# Altium PCB Eth_PoE.PcbDoc (part 3 of 3)
Units mm, origin at the board's own origin, x right, y up, seen from the top; angles counter-clockwise.
Board outline 33 x 53 mm, 2 copper layers (Top Layer, Bottom Layer), stack 0.97 mm thick; 81 components, 62 nets, 294 pads, 109 vias.
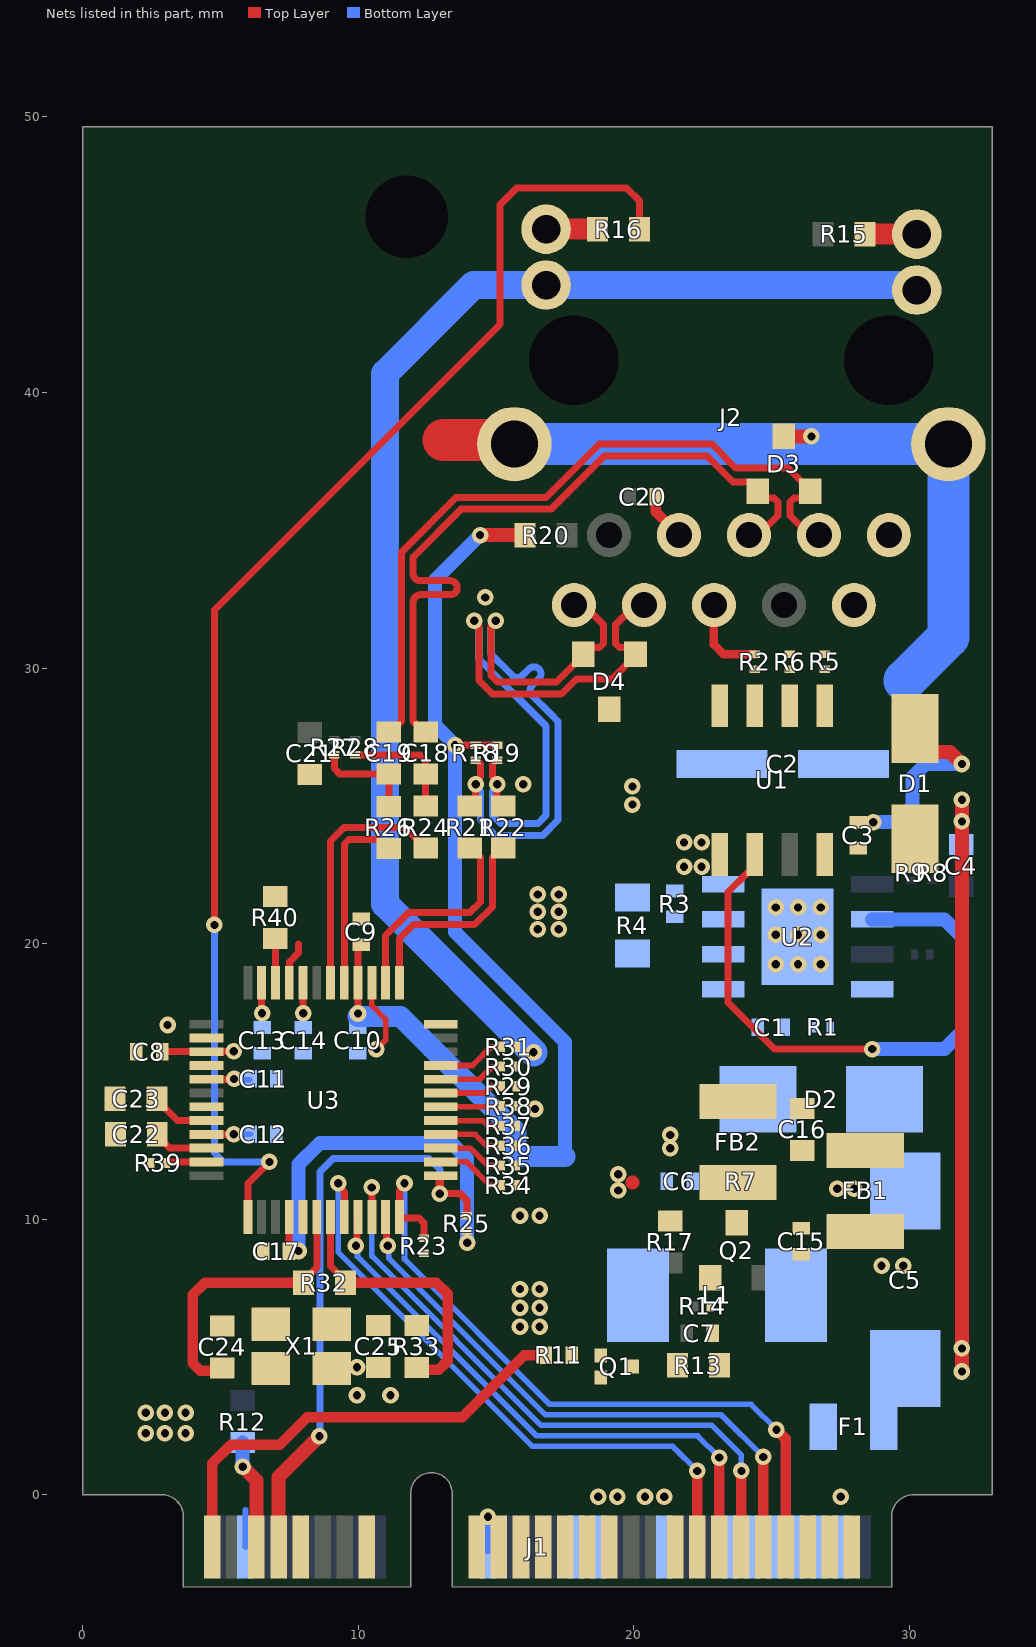
[diagram p2: the nets of this part, all layers, seen from the top]

## Via types
v1: diameter 0.6, hole 0.3, Top Layer to Bottom Layer, 109 vias

## Nets (pads, with @x,y where several pads share a name; then routed paths per layer and width w, separated by ;. In a path a pad name is that pad's centre, name@x,y a point inside that pad or via, vN(x,y) a via of type N, cw(c..) or ccw(c..) an arc to the next point about the centre after c; other vN are vias at no path point) (continued)
GND: C2.2 C5.2 C6.1 C8.1 C9.1 C10.1 C11.1 C12.1 C13.1 C14.1 C15.1 C16.1 C17.1 C20.1 C21.1 C22.1 C23.1 C24.1 C25.1 D2.1 D3.3 D4.3 J1.4 J1.9 J1.15 J1.17 J1.18 J1.19 J1.21 J1.23 J1.25 J1.26 J1.27 J1.28 J1.29 J1.34 J1.35 J1.40 J1.42 J1.44 J1.47 J1.49 J1.50 J1.51 J2.2 J2.7 J2.SH1 J2.SH2 Q1.2 R3.1 R9.1 R34.2 R35.2 R36.2 R37.2 R38.2 R39.2 R40.1 U1.5 U2.4 U3.3 U3.9 U3.14 U3.16 U3.19 U3.29 U3.48 X1.2 X1.4 | length 37
  Top Layer w0.203: U3.3@10.488,18.576 10.488,17.749 10.988,17.249 10.988,16.491 10.792,16.295 10.792,16.268 v1@10.816,16.244 ; D3.3@25.441,38.414 D3.3@25.45,38.405
  Top Layer w0.254: U3.9@7.488,18.576 U3.9@7.521,18.609 ; U3.9@7.495,18.609 7.495,19.336 7.828,19.668 7.828,19.99
  Top Layer w0.381: C20.1@20.79,36.22 20.79,35.667 J2.7@21.631,34.826
  Top Layer w0.508: D3.3@25.45,38.405 v1(26.441,38.405)
  Top Layer w1.524: 13.086,38.284 15.503,38.284 J2.SH1@15.661,38.126
  Bottom Layer w0.203: J1.4@5.9,-1.9 5.9,-0.541
  Bottom Layer w0.508: J1.18@14.7,-1.9 v1(14.7,-0.804)
  Bottom Layer w1.524: J2.SH1@15.661,38.126 J2.SH2@31.411,38.126 31.411,31.135 29.817,29.54
  other v1: 18.7,-0.076 19.4,-0.076 20.4,-0.076 21.1,-0.076 27.5,-0.076 2.286,2.233 2.977,2.233 3.726,2.233 2.286,2.972 2.977,2.972 3.726,2.972 9.948,3.611 11.163,3.611 9.948,4.623 15.863,6.096 16.573,6.096 15.863,6.785 16.573,6.785 15.863,7.463 16.573,7.463 28.987,8.306 29.769,8.306 15.863,10.126 16.573,10.126 27.381,11.1 27.991,11.1 21.321,12.573 21.321,13.056 16.408,13.997 10.654,16.173 3.073,17.046 16.51,20.523 17.272,20.523 16.51,21.158 17.272,21.158 16.51,21.784 17.272,21.784 21.819,22.784 22.454,22.784 21.819,23.673 22.454,23.673 15.977,25.781 14.605,32.563
LAN_ACT: J2.12 R15.1 | length 1.9
  Top Layer w0.762: R15.1@28.388,45.746 J2.12@30.261,45.746
LAN_LINK: J2.14 R16.1 | length 1.9
  Top Layer w0.762: J2.14@16.811,45.926 R16.1@18.684,45.926
LINKLED: R16.2 U3.25 | length 49.7
  Top Layer w0.254: v1(4.775,20.676) 4.775,32.106 15.138,42.469 15.138,46.815 15.745,47.422 19.736,47.422 20.208,46.95 R16.2@20.208,45.926 ; U3.25@5.988,10.076 5.988,11.294 v1(6.769,12.076)
  Bottom Layer w0.254: v1(4.775,20.676) 4.775,12.399 5.098,12.076 v1(6.769,12.076)
NetC1_1: C1.1 D2.2 L1.1 R7.2 U2.1
NetC1_2: C1.2 R1.1
NetC4_2: C4.2 C5.1 F1.1 L1.2 R8.2 | length 20.7
  Top Layer w0.508: v1(31.902,4.47) v1(31.902,5.309) v1(31.902,24.435) v1(31.902,25.216)
NetC6_2: C6.2 R7.1
NetC7_1: C7.1 Q2.1 R13.1 R14.2
NetC15_2: C15.2 FB1.1 Q2.3 R17.1
NetC18_2: C18.2 R24.1 R28.2 | length 4.3
  Top Layer w0.254: R28.2@9.888,26.848 12.237,26.848 12.436,26.649 C18.2@12.436,26.162 R24.1@12.436,24.986
NetC19_2: C19.2 R26.1 R27.2 | length 3.7
  Top Layer w0.254: R27.2@9.126,26.848 9.126,26.347 9.311,26.162 C19.2@11.108,26.162 R26.1@11.108,24.976
NetC22_2: C22.2 U3.22 | length 2
  Top Layer w0.254: C22.2@2.699,13.081 2.699,13.018 3.141,12.576 U3.22@4.488,12.576
NetC23_2: C23.2 U3.20 | length 2.2
  Top Layer w0.254: C23.2@2.692,14.377 2.692,14.313 3.43,13.576 U3.20@4.488,13.576
NetC24_2: C24.2 R32.1 U3.30 X1.1 | length 10.5
  Top Layer w0.254: R32.1@8.001,7.76 8.488,8.246 U3.30@8.488,10.076
  Top Layer w0.381: C24.2@5.055,4.598 4.958,4.501 4.262,4.501 3.988,4.775 3.988,7.252 4.432,7.696 R32.1@8.001,7.696 R32.1@8.001,7.76
NetC25_2: C25.2 R33.1 X1.3
NetQ1_1: Q1.1 R11.2
NetQ1_3: Q1.3 R13.2
NetR1_2: R1.2 U2.8
NetR2_1: R2.1 U1.3
NetR4_1: R4.1 U2.2 U2.9
  other v1: 25.146,19.253 25.954,19.253 26.776,19.253 25.146,20.32 25.954,20.32 26.776,20.32 25.146,21.311 25.954,21.311 26.776,21.311
NetR5_2: R5.2 U1.1
NetR6_2: R6.2 U1.2
NetR21_2: R21.2 U3.2 | length 7.8
  Top Layer w0.254: U3.2@10.988,18.576 10.988,20.295 11.812,21.12 14.036,21.12 14.43,21.514 14.43,23.132 14.099,23.462 R21.2@14.036,23.462
NetR22_2: R22.2 U3.1 | length 7.8
  Top Layer w0.254: U3.1@11.488,18.576 11.488,20.185 11.991,20.688 14.215,20.688 14.861,21.335 14.861,23.132 15.192,23.462 R22.2@15.255,23.462
NetR24_2: R24.2 U3.6 | length 9.1
  Top Layer w0.254: U3.6@8.988,18.576 8.988,23.722 9.479,24.214 11.685,24.214 12.118,23.78 12.118,23.716 12.372,23.462 R24.2@12.436,23.462
NetR26_2: R26.2 U3.5 | length 6.9
  Top Layer w0.254: U3.5@9.488,18.576 9.488,23.612 9.656,23.78 10.716,23.78 11.044,23.452 R26.2@11.108,23.452
NetR29_2: R29.2 U3.43 | length 2.3
  Top Layer w0.203: U3.43@12.988,14.576 14.575,14.576 14.818,14.819 R29.2@15.178,14.819
NetR30_2: R30.2 U3.44 | length 2.4
  Top Layer w0.203: U3.44@12.988,15.076 14.402,15.076 14.857,15.531 15.172,15.531 R30.2@15.178,15.538
NetR31_2: R31.2 U3.45 | length 2.5
  Top Layer w0.203: U3.45@12.988,15.576 14.138,15.576 14.818,16.256 R31.2@15.178,16.256
NetR32_2: R32.2 R33.2 U3.31 | length 10.2
  Top Layer w0.254: U3.31@8.988,10.076 8.988,8.297 R32.2@9.525,7.76
  Top Layer w0.381: R32.2@9.525,7.76 R32.2@9.525,7.696 12.827,7.696 13.233,7.29 13.233,4.851 12.909,4.527 12.212,4.527 R33.2@12.116,4.623
NetR34_1: R34.1 U3.38 | length 2.5
  Top Layer w0.203: U3.38@12.988,12.076 13.931,12.076 14.78,11.227 R34.1@15.178,11.227
NetR35_1: R35.1 U3.39 | length 2.5
  Top Layer w0.203: U3.39@12.988,12.576 14.062,12.576 14.693,11.945 R35.1@15.178,11.945
NetR36_1: R36.1 U3.40 | length 2.4
  Top Layer w0.203: U3.40@12.988,13.076 14.235,13.076 14.647,12.664 R36.1@15.178,12.664
NetR37_1: R37.1 U3.41 | length 2.3
  Top Layer w0.203: U3.41@12.988,13.576 14.518,13.576 14.712,13.382 R37.1@15.178,13.382
NetR38_1: R38.1 U3.42 | length 2.2
  Top Layer w0.203: U3.42@12.988,14.076 15.145,14.076 15.178,14.109 R38.1@15.178,14.152
NetR39_1: R39.1 U3.23 | length 1.5
  Top Layer w0.254: R39.1@3.018,12.04 3.018,12.042 3.052,12.076 U3.23@4.488,12.076
NetR40_2: R40.2 U3.10 | length 1.6
  Top Layer w0.254: R40.2@6.985,20.193 6.988,20.191 U3.10@6.988,18.576
NetU1_6: U1.6 U2.6 | length 22.2
  Top Layer w0.254: U1.6@24.384,23.233 24.384,22.758 24.211,22.585 24.13,22.585 23.414,21.869 23.414,17.861 25.103,16.172 v1(28.643,16.172)
  Bottom Layer w0.508: v1(28.643,16.172) 31.267,16.172 31.902,16.807 31.902,20.244 31.267,20.879 U2.6@28.643,20.879
POE_5V: F1.2 J1.46 J1.48
POE_PWR_N: C3.1 D1.2 J2.1 R5.1 R6.1 U1.4 | length 7.3
  Top Layer w0.508: D1.2@30.201,27.806 30.201,27.406 D1.2@30.645,26.962 ; D1.2@30.584,26.962 D1.2@30.645,26.962 ; v1(31.902,26.518) 31.458,26.962 D1.2@30.645,26.962
  Bottom Layer w0.508: v1(28.686,24.407) 29.55,24.407 30.11,24.967 30.11,26.05 30.578,26.518 v1(31.902,26.518)
POE_PWR_P: C2.1 C3.2 D1.1 J2.6 R2.2 R3.2 R4.2 U1.8 U2.3 | length 3.1
  Top Layer w0.305: J2.6@22.901,32.286 22.901,30.849 23.249,30.501 R2.2@24.384,30.501
  other v1: 19.946,25.044 19.946,25.705
RD_N: C19.1 D3.2 J2.3 | length 26.7
  Top Layer w0.254: C19.1@11.108,27.686 11.171,27.686 11.556,28.071 11.556,34.204 13.547,36.195 16.812,36.195 18.743,38.126 22.826,38.126 23.689,37.262 25.593,37.262 26.391,36.464 D3.2@26.391,36.414 26.15,36.173 25.806,36.173 25.657,36.024 25.657,35.534 26.365,34.826 J2.3@26.711,34.826
RD_P: C18.1 D3.1 J2.5 | length 26.6
  Top Layer w0.254: C18.1@12.436,27.686 12.372,27.686 11.988,28.071 11.988,31.771 11.988,32.406 cw(c12.242,32.406) 12.242,32.66 13.332,32.66 ccw(c13.332,32.914) 13.332,33.168 12.242,33.168 cw(c12.242,33.422) 11.988,33.422 11.988,34.025 12.036,34.073 13.726,35.763 16.991,35.763 18.922,37.694 22.647,37.694 23.593,36.748 24.059,36.748 24.208,36.747 24.491,36.464 D3.1@24.491,36.414 24.732,36.173 25.076,36.173 25.225,36.024 25.225,35.54 24.511,34.826 J2.5@24.171,34.826
TD_N: D4.1 J2.8 R19.1 R22.1 | length 24.8
  Top Layer w0.254: v1(14.207,31.72) 14.38,31.547 14.38,29.545 14.867,29.058 17.374,29.058 17.92,29.604 19.21,29.604 20.057,30.451 D4.1@20.057,30.501 19.816,30.742 19.472,30.742 19.323,30.891 19.323,31.572 20.037,32.286 J2.8@20.361,32.286 ; 14.861,26.048 14.861,26.526 14.984,26.649 R19.1@15.034,26.649 ; v1(15.034,25.781) 15.034,25.207 R22.1@15.255,24.986
  Bottom Layer w0.254: v1(14.207,31.72) 14.207,31.627 14.38,31.454 14.38,30.322 16.815,27.886 16.815,24.663 16.51,24.358 15.16,24.358 14.861,24.657 14.861,25.514 15.034,25.687 v1(15.034,25.781)
TD_P: D4.2 J2.10 R18.1 R21.1 | length 24.7
  Top Layer w0.254: R21.1@14.036,24.986 14.257,25.207 v1(14.257,25.781) ; R18.1@14.257,26.649 14.307,26.649 14.43,26.526 14.43,26.048 ; v1(14.984,31.72) 14.811,31.547 14.811,29.724 15.046,29.489 17.195,29.489 18.157,30.451 D4.2@18.157,30.501 18.398,30.742 18.742,30.742 18.891,30.891 18.891,31.572 18.176,32.286 J2.10@17.821,32.286
  Bottom Layer w0.254: v1(14.257,25.781) 14.257,25.687 14.43,25.514 14.43,24.478 14.981,23.926 16.689,23.926 17.247,24.484 17.247,28.065 16.963,28.349 16.305,29.007 cw(c16.484,29.186) 16.305,29.366 16.55,29.612 ccw(c16.371,29.791) 16.55,29.971 ccw(c16.371,29.791) 16.191,29.971 15.946,29.725 cw(c15.766,29.905) 15.586,29.725 15.497,29.815 14.811,30.5 14.811,31.454 14.984,31.627 v1(14.984,31.72)
TYPE1: J1.5 R12.1 | length 4
  Top Layer w0.508: v1(5.8,1.016) 6.3,0.516 J1.5@6.3,-1.9
  Bottom Layer w0.508: v1(5.8,1.016) R12.1@5.8,1.893
VDD: C16.2 C17.2 FB1.2 FB2.1 J2.11 J2.13 R23.1 R25.1 R29.1 R30.1 R31.1 U3.28 | length 62
  Top Layer w0.203: C17.2@7.48,8.839 7.484,8.843 v1(7.828,8.843) ; U3.28@7.484,10.072 U3.28@7.488,10.076
  Top Layer w0.254: C17.2@7.484,8.843 U3.28@7.484,10.072
  Bottom Layer w0.508: v1(7.828,8.843) 7.828,11.992 8.6,12.764 13.373,12.764 13.945,12.192 v1(13.945,9.144)
  Bottom Layer w1.016: v1(16.358,16.053) 10.973,21.438 10.973,40.691 14.178,43.896 J2.13@16.811,43.896 29.869,43.896 30.049,43.716 J2.11@30.261,43.716
VDDA: C8.2 C9.2 C10.2 C11.2 C12.2 C13.2 C14.2 FB2.2 R18.2 R19.2 R20.2 U3.4 U3.8 U3.11 U3.15 U3.17 U3.21 | length 48.6
  Top Layer w0.203: U3.21@4.488,13.076 U3.21@4.49,13.078 ; U3.17@4.488,15.076 U3.17@4.494,15.069 ; v1@5.477,13.078 v1(5.48,13.081) ; v1@5.48,15.069 v1@5.486,15.062
  Top Layer w0.254: C8.2@2.883,16.078 2.886,16.076 U3.15@4.488,16.076 v1@5.48,16.076 ; U3.21@4.49,13.078 v1@5.477,13.078 ; U3.17@4.494,15.069 v1@5.48,15.069 ; v1@6.488,17.6 U3.11@6.488,18.576 ; U3.8@7.988,18.576 7.991,18.572 v1@7.991,17.627 ; v1@9.988,17.463 U3.4@9.988,18.576 C9.2@9.988,19.921 ; v1(13.508,27.199) R18.2@14.257,27.199 R19.2@15.034,27.199
  Top Layer w0.381: v1@5.486,15.062 v1(5.486,15.088)
  Top Layer w0.508: v1(14.413,34.826) R20.2@16.053,34.826 ; 19.939,11.328 19.94,11.329 ; FB2.2@24.764,11.329 FB2.2@24.765,11.331
  Bottom Layer w0.203: v1(5.48,13.081) C12.2@6.083,13.081 ; v1@5.486,15.062 C11.2@6.058,15.062
  Bottom Layer w0.508: v1(14.413,34.826) 12.776,33.189 12.776,27.931 v1(13.508,27.199) 13.508,20.426 17.501,16.434 17.501,12.268
  Bottom Layer w0.762: v1@9.984,17.361 11.535,17.361 15.723,13.173 15.723,12.383 15.838,12.268 17.501,12.268
  other v1: 19.432,11.042 19.431,11.633 5.48,16.095 9.984,17.463 6.502,17.473 7.994,17.473
W5500_CS: J1.37 U3.32 | length 22.9
  Top Layer w0.254: v1(9.271,11.303) 9.271,11.214 9.5,10.986 U3.32@9.5,10.088
  Top Layer w0.381: J1.37@22.3,-1.9 v1(22.3,0.86)
  Bottom Layer w0.203: v1(9.271,11.303) 9.271,8.794 16.312,1.753 21.407,1.753 v1(22.3,0.86)
W5500_INT: J1.45 R23.2 U3.36 | length 26
  Top Layer w0.254: v1(11.671,11.303) 11.671,11.196 11.488,11.012 U3.36@11.488,10.076 11.527,10.036 12.193,10.036 12.378,9.851 R23.2@12.378,9.305
  Top Layer w0.381: v1(25.169,2.359) 25.5,2.029 J1.45@25.5,-1.9
  Bottom Layer w0.203: v1(11.671,11.303) 11.671,8.549 16.943,3.277 24.252,3.277 v1(25.169,2.359)
W5500_MISO: J1.41 U3.34 | length 23.3
  Top Layer w0.254: v1(10.488,11.151) U3.34@10.488,10.076 U3.34@10.514,10.102
  Top Layer w0.381: J1.41@23.9,-1.9 v1(23.9,0.86)
  Bottom Layer w0.203: v1(10.488,11.151) 10.488,8.655 16.628,2.515 22.825,2.515 23.9,1.44 v1(23.9,0.86)
W5500_MOSI: J1.43 U3.35 | length 21.4
  Top Layer w0.254: U3.35@10.988,10.076 11.021,10.043 11.021,9.076 v1(11.067,9.03)
  Top Layer w0.381: J1.43@24.7,-1.9 v1@24.7,1.369
  Bottom Layer w0.203: v1(11.067,9.03) 11.105,8.992 11.105,8.576 16.786,2.896 23.167,2.896 v1(24.694,1.369)
W5500_PWR_EN: J1.1 R11.1 | length 16.8
  Top Layer w0.381: J1.1@4.7,-1.9 4.7,1.133 5.375,1.809 7.151,1.809 8.146,2.803 13.761,2.803 16.013,5.055 R11.1@16.802,5.055
W5500_RST: J1.7 R25.2 U3.37 | length 22.1
  Top Layer w0.254: v1(12.954,10.922) 13.695,10.922 13.931,10.686 R25.2@13.931,10.126 ; U3.37@12.954,11.542 U3.37@12.988,11.576
  Top Layer w0.305: v1(12.954,10.922) U3.37@12.954,11.542
  Top Layer w0.508: J1.7@7.1,-1.9 7.1,0.637 v1(8.585,2.122)
  Bottom Layer w0.254: v1@8.6,2.122 8.6,11.718 9.074,12.192 12.56,12.192 12.954,11.798 v1(12.954,10.922)
W5500_SCLK: J1.39 U3.33 | length 20.9
  Top Layer w0.254: v1(9.908,9.03) 9.955,9.076 9.955,10.043 U3.33@9.988,10.076
  Top Layer w0.381: J1.39@23.1,-1.9 v1(23.099,1.345)
  Bottom Layer w0.203: v1(9.908,9.03) 9.966,8.972 9.966,8.638 16.47,2.134 22.311,2.134 v1(23.099,1.345)
pads on no net: J1.2 J1.3 J1.10 J1.11 J1.12 J1.13 J1.14 J1.16 J1.20 J1.22 J1.30 J1.31 J1.32 J1.33 J1.36 J1.38 J2.MH1 J2.MH2 U1.7 U3.7 U3.12 U3.13 U3.18 U3.24 U3.26 U3.46 U3.47

## Polygon pours and split planes (outlines as drawn)
GND on Top Layer "GND_L01_P001" (solid, remove dead copper, pour order 1): 0.813,1.164 5.055,1.164 cw(c4.895,0.16) 5.9,0 5.9,-3.05 11.455,-3.05 11.455,0.051 cw(c12.611,0.029) 13.767,0 13.767,-3.05 28.2,-3.05 28.2,1.48 cw(c29.26,1.48) 29.26,2.54 30.46,2.54 30.46,48.489 0.813,48.489
GND on Bottom Layer "GND_L02_P000" (solid, remove dead copper, pour order 0): 0.813,1.115 3.965,1.115 cw(c3.965,0.254) 4.826,0.254 4.826,-3.05 11,-3.112 11,0 11,0.051 cw(c12.7,0.051) 14.4,0.051 14.4,-3.05 26.81,-3.05 26.81,1.74 cw(c27.61,1.74) 27.61,2.54 30.46,2.54 30.46,48.489 0.813,48.489

## Keep-outs
Keep-Out Layer:
  circle w0.127: c11.759,46.376 r2.5

## Other copper
Top Layer:
  rectangle net NetC15_2: 26.992,8.918 29.802,10.333
  rectangle net NetC15_2: 25.626,9.282 26.513,10.333
  rectangle net NetC15_2: 23.279,9.412 24.166,10.332
  rectangle net NetC15_2: 20.876,9.548 21.763,10.333
  rectangle net 3V3: 20.876,8.617 25.083,9.142
  rectangle net 3V3: 26.992,0.711 32.461,1.575
  rectangle net POE_PWR_N: 22.814,26.543 31.051,27.543
  rectangle net POE_PWR_P: 19.312,24.562 20.574,26.035
  rectangle net POE_PWR_N: 27.826,24.168 28.973,24.63
  rectangle net POE_PWR_P: 19.312,24.968 31.051,26.035
  rectangle net POE_PWR_P: 26.624,22.458 31.051,23.749
  rectangle net CT_R: 7.785,27.263 10.073,28.042
  rectangle net NetQ1_3: 19.725,4.254 21.956,5.143
  rectangle net NetR4_1: 24.637,18.493 27.25,21.995
  rectangle net GND: 21.539,22.458 23.414,24.008
  rectangle net POE_PWR_N: 25.469,30.366 31.051,31.115
  rectangle net NetR5_2: 26.739,27.858 27.109,30.086
  rectangle net NetR6_2: 25.469,27.858 25.839,30.086
  rectangle net NetR2_1: 24.199,28.956 24.569,30.086
  rectangle net POE_PWR_N: 22.814,26.543 23.414,29.408
  rectangle net VDD: 12.988,8.141 14.116,9.711
  rectangle net NetQ1_1: 17.513,4.805 19.025,5.309
  rectangle net VDD: 17.222,8.141 18.009,16.441
  rectangle net VDD: 12.988,8.141 18.009,9.44
  rectangle net VDD: 12.193,8.141 18.009,8.89
  rectangle net VDDA: 19.117,10.696 25.179,11.966
  rectangle net 3V3: 24.133,4.254 31.115,7.696
  rectangle net 3V3: 26.992,0.808 31.115,6.576
  rectangle net VDD: 15.593,14.605 18.009,16.441
  rectangle net NetR32_2: 11.671,3.985 12.56,5.004
  rectangle net GND: 4.61,5.585 7.525,6.785
  rectangle net NetC25_2: 8.325,5.766 12.56,6.785
  rectangle net GND: 8.325,3.985 11.163,5.004
  rectangle net NetC24_2: 4.61,3.985 7.525,4.979
  rectangle net GND: 19.141,-0.381 21.8,0.254
  rectangle net VDD: 17.272,13.638 29.896,14.908
  rectangle net VDD: 26.992,11.86 29.896,14.908
  rectangle net 3V3: 24.133,7.386 25.083,9.142
  rectangle net NetC15_2: 20.876,9.663 29.802,10.332
  rectangle net 3V3: 20.876,5.55 21.918,9.144
  rectangle net NetC7_1: 22.63,6.648 23.183,8.332
  rectangle net 3V3: 21.575,5.55 22.35,7.018
  rectangle net NetC7_1: 22.629,4.254 23.48,8.332
  rectangle net POE_PWR_N: 28.321,33.909 31.051,35.626
  rectangle net POE_PWR_N: 29.351,26.543 31.051,35.626
  pour cut-out: 20.361,27.432 20.361,28.961 23.825,28.961 23.83,28.956 23.83,24.262 18.371,24.262 18.371,27.432
Bottom Layer:
  rectangle net VDDA: 5.182,14.77 6.312,15.405
  rectangle net VDDA: 5.182,12.764 6.312,13.399
  rectangle net NetC4_2: 28.565,1.614 29.565,5.979
  rectangle net POE_5V: 25.727,1.614 27.365,3.314
  rectangle net NetR1_2: 27.868,18.039 29.418,18.639
  rectangle net POE_PWR_P: 19.304,20.523 20.574,27.965
  rectangle net GND: 27.868,22.716 30.23,23.592
  rectangle net 3V3: 30.15,0.462 32.41,1.829
  rectangle net NetC4_2: 19.012,3.64 32.41,4.953
  rectangle net NetC4_2: 19.012,3.64 22.504,8.939
  rectangle net VDDA: 5.182,12.764 5.855,17.831
  rectangle net VDDA: 5.182,16.726 10.3,17.831
  rectangle net POE_5V: 25.727,-3.05 26.899,3.314
  rectangle net GND: 21.065,34.26 22.197,38.126
  rectangle net GND: 27.076,27.143 32.326,33.086
  rectangle net VDDA: 15.342,10.693 19.812,12.764
  rectangle net VDDA: 5.48,14.77 6.312,15.405
  rectangle net VDDA: 5.48,12.764 6.312,13.399
  rectangle net VDDA: 9.665,16.904 10.3,17.63
  rectangle net VDDA: 7.683,16.904 8.319,17.6
  rectangle net VDDA: 6.185,16.904 6.82,17.63
  rectangle net GND: 5.701,-2.109 6.12,-0.323
  rectangle net GND: 20.8,-0.381 23.711,0.254
  rectangle net GND: 27.273,-1.9 27.723,-0.076
  rectangle net 3V3: 16.876,-3.05 17.333,0.051
  rectangle net NetR1_2: 26.993,16.782 29.266,17.285
  rectangle net NetC1_1: 23.495,16.65 24.727,17.285
  rectangle net NetC4_2: 28.56,2.923 32.41,5.979
  rectangle net NetC4_2: 30.635,22.716 32.326,25.578
  rectangle net GND: 27.697,9.363 31.536,15.551
  rectangle net NetC1_1: 24.257,5.539 25.897,13.699
  rectangle net NetC6_2: 21.907,10.909 23.495,11.798
  rectangle net NetR1_2: 28.067,16.782 29.266,18.639
  rectangle net DCDC_POK: 28.303,19.309 30.315,19.909
  rectangle net NetR4_1: 19.304,19.126 27.25,20.142
  rectangle net NetC1_1: 22.468,13.151 24.018,18.639
  rectangle net NetC1_2: 25.209,16.65 26.713,17.285
  rectangle net NetC4_2: 30.635,22.716 32.326,23.973
  rectangle net FB: 27.868,21.687 32.326,22.449
  rectangle net GND: 26.007,26.018 29.4,27.965
  rectangle net POE_PWR_P: 19.304,26.018 24.7,27.965
  rectangle net POE_PWR_P: 19.304,20.579 24.018,21.196
  rectangle net POE_PWR_P: 21.996,26.018 23.774,33.086
  rectangle net GND: 27.076,26.018 29.535,33.086
  pour cut-out: 22.18,21.455 24.365,21.455 24.383,21.473 24.383,21.666 21.031,21.666 21.031,25.578 25.095,25.578 25.095,28.956 18.847,28.956 18.847,18.791 22.18,18.791

## Silkscreen, mask and mechanical layers (free items; w line width, h text height)
Top Overlay:
  lines w0.127: 1.079,14.91 1.086,14.91 1.086,16.739 ; 1.086,12.548 1.27,12.548 1.27,11.532 ; 2.134,16.485 1.905,16.485 1.905,17.12 2.133,17.348 ; 2.769,11.531 2.769,11.786 ; 5.156,9.119 6.223,9.119 ; 9.126,26.64 9.144,26.64 9.144,25.444 ; 9.703,23.444 10.574,23.444 ; 9.888,27.605 9.931,27.605 9.931,28.242 ; 10.719,4.14 10.668,4.14 10.668,3.277 11.582,3.277 ; 11.902,22.085 12.446,22.085 12.446,23.005 12.436,23.005 ; 12.632,8.795 13.233,8.795 ; 14.185,9.851 14.912,9.851 15.188,9.575 15.188,9.295 ; 14.257,27.407 14.257,27.788 16.002,27.788 ; 15.288,26.594 15.723,26.594 ; 16.104,26.213 15.723,26.594 ; 16.482,3.866 16.485,4.648 ; 19.509,8.814 19.509,9.167 20.787,9.167 ; 20.787,6.933 22.007,6.933 ; 21.601,5.461 21.601,5.69 ; 22.174,9.685 22.403,9.685 22.403,10.504 ; 22.885,29.87 24.13,29.87 ; 23.175,5.867 24.816,5.867 24.816,5.41 ; 23.901,31.267 25.654,31.267 25.654,30.709 ; 26.477,8.659 26.997,8.659 26.997,8.084 ; 15.723,26.594 15.723,26.594 ; 22.403,10.504 22.403,10.504 ; 14.681,10.719 16.205,10.719 16.205,17.043 14.681,17.043 14.681,10.719 ; 16.573,9.575 20.01,9.575 20.01,18.999 16.573,18.999 16.573,9.575
  text "Eth_PoE-v2.0" at 2.108,36.627 h1.02 r90
  text "#" at 17.881,19.037 h0.89
  text "#" at 14.96,17.005 h0.89
Bottom Overlay:
  drawing of 29 lines, arcs and shapes, not listed
  text "ZERO CARBON FOOTPRINT" at 1.523,28.423 h1.52 r270
Board Outline:
  lines w0.127: 11.899,-3.35 3.65,-3.355 3.65,-0.8 ccw(c2.85,-0.8) 2.85,0 0,0 ; 11.899,-3.349 11.9,0.051 cw(c12.65,0.051) 13.4,0.051 13.399,-3.349 ; 13.399,-3.35 29.35,-3.355 29.35,-0.8 cw(c30.15,-0.8) 30.15,0 33,0 ; 0,0 0,49.642 ; 0,0 0,49.642 ; 0,49.642 33,49.642 ; 0,49.642 33,49.642 ; 33,0 33,49.642 ; 33,0 33,0 ; 33,49.642 33,49.642
Fabrication:
  drawing of 191 lines, arcs and shapes, not listed
  text "Layer" at 36.112,56.82 h1.52
  text "Name" at 46.524,56.82 h1.52
  text "Material" at 70.14,56.82 h1.52
  text "Thickness" at 91.978,56.82 h1.52
  text "Constant" at 108.483,56.82 h1.52
  text "Board Layer Stack" at 122.958,56.82 h1.52
  text "Top Overlay" at 46.524,53.772 h1.52
  text "Top Solder" at 46.524,50.724 h1.52
  text "Solder Resist" at 70.14,50.724 h1.52
  text "0.59mil" at 91.978,50.724 h1.52
  text "3.5" at 108.483,50.724 h1.52
  text "1" at 36.112,47.676 h1.52
  text "Top Layer" at 46.524,47.676 h1.52
  text "1.38mil" at 91.978,47.676 h1.52
  text "Dielectric 1" at 46.524,44.628 h1.52
  text "FR-4" at 70.14,44.628 h1.52
  text "35.43mil" at 91.978,44.628 h1.52
  text "4.8" at 108.483,44.628 h1.52
  text "2" at 36.112,41.58 h1.52
  text "Bottom Layer" at 46.524,41.58 h1.52
  text "1.38mil" at 91.978,41.58 h1.52
  text "Bottom Solder" at 46.524,38.532 h1.52
  text "Solder Resist" at 70.14,38.532 h1.52
  text "0.59mil" at 91.978,38.532 h1.52
  text "3.5" at 108.483,38.532 h1.52
  text "Bottom Overlay" at 46.524,35.484 h1.52
Drill Drawing:
  circle w0.254: c-18.45,79.498 r0.847
  lines w0.254: -19.297,67.221 -18.45,67.644 -17.603,67.221 -18.027,68.068 -17.603,68.914 -18.45,68.491 -19.297,68.914 -18.873,68.068 -19.297,67.221 ; -19.297,71.454 -18.873,71.454 -18.45,71.031 -18.027,71.454 -17.603,71.454 -18.027,71.878 -17.603,72.301 -18.027,72.301 -18.45,72.724 -18.873,72.301 -19.297,72.301 -18.873,71.878 -19.297,71.454 ; -19.297,74.841 -17.603,74.841 -17.603,76.534 -19.297,76.534 -19.297,74.841 ; -19.297,84.154 -17.603,84.154 -18.45,82.461 -19.297,84.154 ; -19.297,86.271 -19.297,86.694 -18.873,87.118 -19.297,87.541 -19.297,87.964 -18.873,87.964 -18.45,87.541 -18.027,87.964 -17.603,87.964 -17.603,87.541 -18.027,87.118 -17.603,86.694 -17.603,86.271 -18.027,86.271 -18.45,86.694 -18.873,86.271 -19.297,86.271
  lines w0.381: -20.815,66.078 304.417,66.078 ; -20.815,88.938 304.417,88.938 ; -6.823,62.268 -6.823,92.748 ; 8.159,62.268 8.159,92.748 ; 37.36,62.268 37.36,92.748 ; 50.21,62.268 50.21,92.748 ; 68.848,62.268 68.848,92.748 ; 106.937,62.268 106.937,92.748 ; 121.919,62.268 121.919,92.748 ; 140.862,62.268 140.862,92.748 ; 157.368,62.268 157.368,92.748 ; 179.054,62.268 179.054,92.748 ; 212.927,62.268 212.927,92.748 ; 246.801,62.268 246.801,92.748 ; 268.791,62.268 268.791,92.748 ; -20.815,62.268 304.417,62.268 304.417,92.748 -20.815,92.748 -20.815,62.268
  text "Symbol" at -18.529,90.081 h1.83
  text "Count" at -5.68,90.081 h1.83
  text "Hole Size" at 9.302,90.081 h1.83
  text "Plated" at 38.503,90.081 h1.83
  text "Hole Type" at 51.353,90.081 h1.83
  text "Drill Layer Pair" at 69.991,90.081 h1.83
  text "Via/Pad" at 108.08,90.081 h1.83
  text "Pad Shape" at 123.062,90.081 h1.83
  text "Template" at 142.005,90.081 h1.83
  text "Description" at 158.511,90.081 h1.83
  text "Hole Tolerance (+)" at 180.197,90.081 h1.83
  text "Hole Tolerance (-)" at 214.07,90.081 h1.83
  text "Hole Length" at 247.944,90.081 h1.83
  text "Routed Path Length" at 269.934,90.081 h1.83
  text "1" at -5.68,86.271 h1.52
  text "3.000mm (118.11mil)" at 9.302,86.271 h1.52
  text "NPTH" at 38.503,86.271 h1.52
  text "Round" at 51.353,86.271 h1.52
  text "Top Layer - Bottom Layer" at 69.991,86.271 h1.52
  text "Pad" at 108.08,86.271 h1.52
  text "Rounded" at 123.062,86.271 h1.52
  text "c0hn300" at 142.005,86.271 h1.52
  text "-" at 247.944,86.271 h1.52
  text "-" at 269.934,86.271 h1.52
  text "2" at -5.68,82.461 h1.52
  text "1.700mm (66.93mil)" at 9.302,82.461 h1.52
  text "PTH" at 38.503,82.461 h1.52
  text "Round" at 51.353,82.461 h1.52
  text "Top Layer - Bottom Layer" at 69.991,82.461 h1.52
  text "Pad" at 108.08,82.461 h1.52
  text "Rounded" at 123.062,82.461 h1.52
  text "c270h170" at 142.005,82.461 h1.52
  text "-" at 247.944,82.461 h1.52
  text "-" at 269.934,82.461 h1.52
  text "2" at -5.68,78.651 h1.52
  text "3.250mm (127.95mil)" at 9.302,78.651 h1.52
  text "NPTH" at 38.503,78.651 h1.52
  text "Round" at 51.353,78.651 h1.52
  text "Top Layer - Bottom Layer" at 69.991,78.651 h1.52
  text "Pad" at 108.08,78.651 h1.52
  text "Rounded" at 123.062,78.651 h1.52
  text "c0hn325" at 142.005,78.651 h1.52
  text "-" at 247.944,78.651 h1.52
  text "-" at 269.934,78.651 h1.52
  text "4" at -5.68,74.841 h1.52
  text "1.040mm (40.95mil)" at 9.302,74.841 h1.52
  text "PTH" at 38.503,74.841 h1.52
  text "Round" at 51.353,74.841 h1.52
  text "Top Layer - Bottom Layer" at 69.991,74.841 h1.52
  text "Pad" at 108.08,74.841 h1.52
  text "Rounded" at 123.062,74.841 h1.52
  text "c180h104" at 142.005,74.841 h1.52
  text "-" at 247.944,74.841 h1.52
  text "-" at 269.934,74.841 h1.52
  text "10" at -5.68,71.031 h1.52
  text "0.940mm (37.01mil)" at 9.302,71.031 h1.52
  text "PTH" at 38.503,71.031 h1.52
  text "Round" at 51.353,71.031 h1.52
  text "Top Layer - Bottom Layer" at 69.991,71.031 h1.52
  text "Pad" at 108.08,71.031 h1.52
  text "Rounded" at 123.062,71.031 h1.52
  text "c160h94" at 142.005,71.031 h1.52
  text "-" at 247.944,71.031 h1.52
  text "-" at 269.934,71.031 h1.52
  text "109" at -5.68,67.221 h1.52
  text "0.300mm (11.81mil)" at 9.302,67.221 h1.52
  text "PTH" at 38.503,67.221 h1.52
  text "Round" at 51.353,67.221 h1.52
  text "Top Layer - Bottom Layer" at 69.991,67.221 h1.52
  text "Via" at 108.08,67.221 h1.52
  text "Rounded" at 123.062,67.221 h1.52
  text "v60h30" at 142.005,67.221 h1.52
  text "-" at 247.944,67.221 h1.52
  text "-" at 269.934,67.221 h1.52
  text "128 Total" at -5.68,63.411 h1.52

## Dimensions
0,49.642 to 33,49.642 on Draft and Dimension
0,49.642 to 3.65,-3.355 on Draft and Dimension

## Text inside footprints (layer, text, board x,y; h text height)
J1: Top Overlay "1" at 3.514,-0.653 h0.89; Top Overlay "17" at 13.496,-0.48 h0.89; Top Overlay "51" at 28.054,-0.622 h0.89; Top Overlay "PCB EDGE" at 4.882,0.346 h1.02; Top Overlay "15" at 9.839,-0.541 h0.89; Top Overlay "Cutout Area" at 11.21,1.007 h0.89
J2: Bottom Overlay "PCB Edge" at 26.264,48.767 h1.52